# EAGLE board Orb Mainboard Rev C - SMT Antenna (EAGLE 9.7.0)
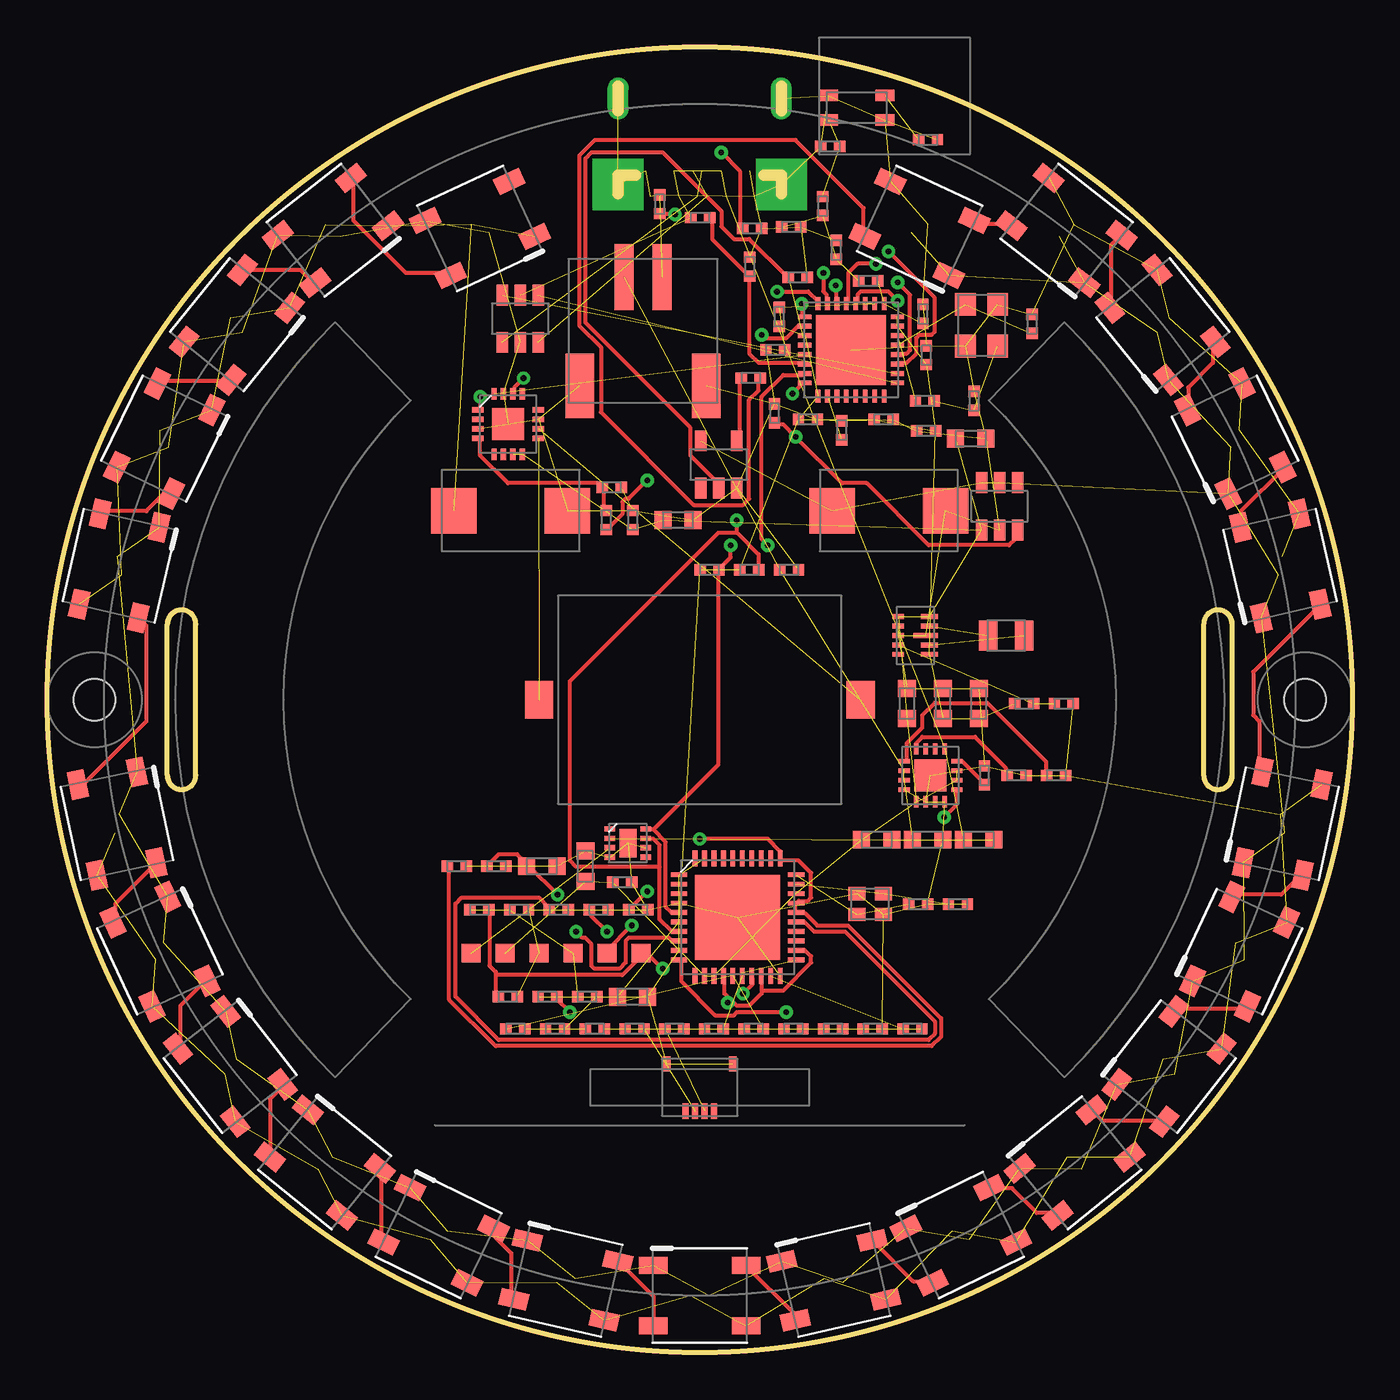
[diagram p0: board, top side]
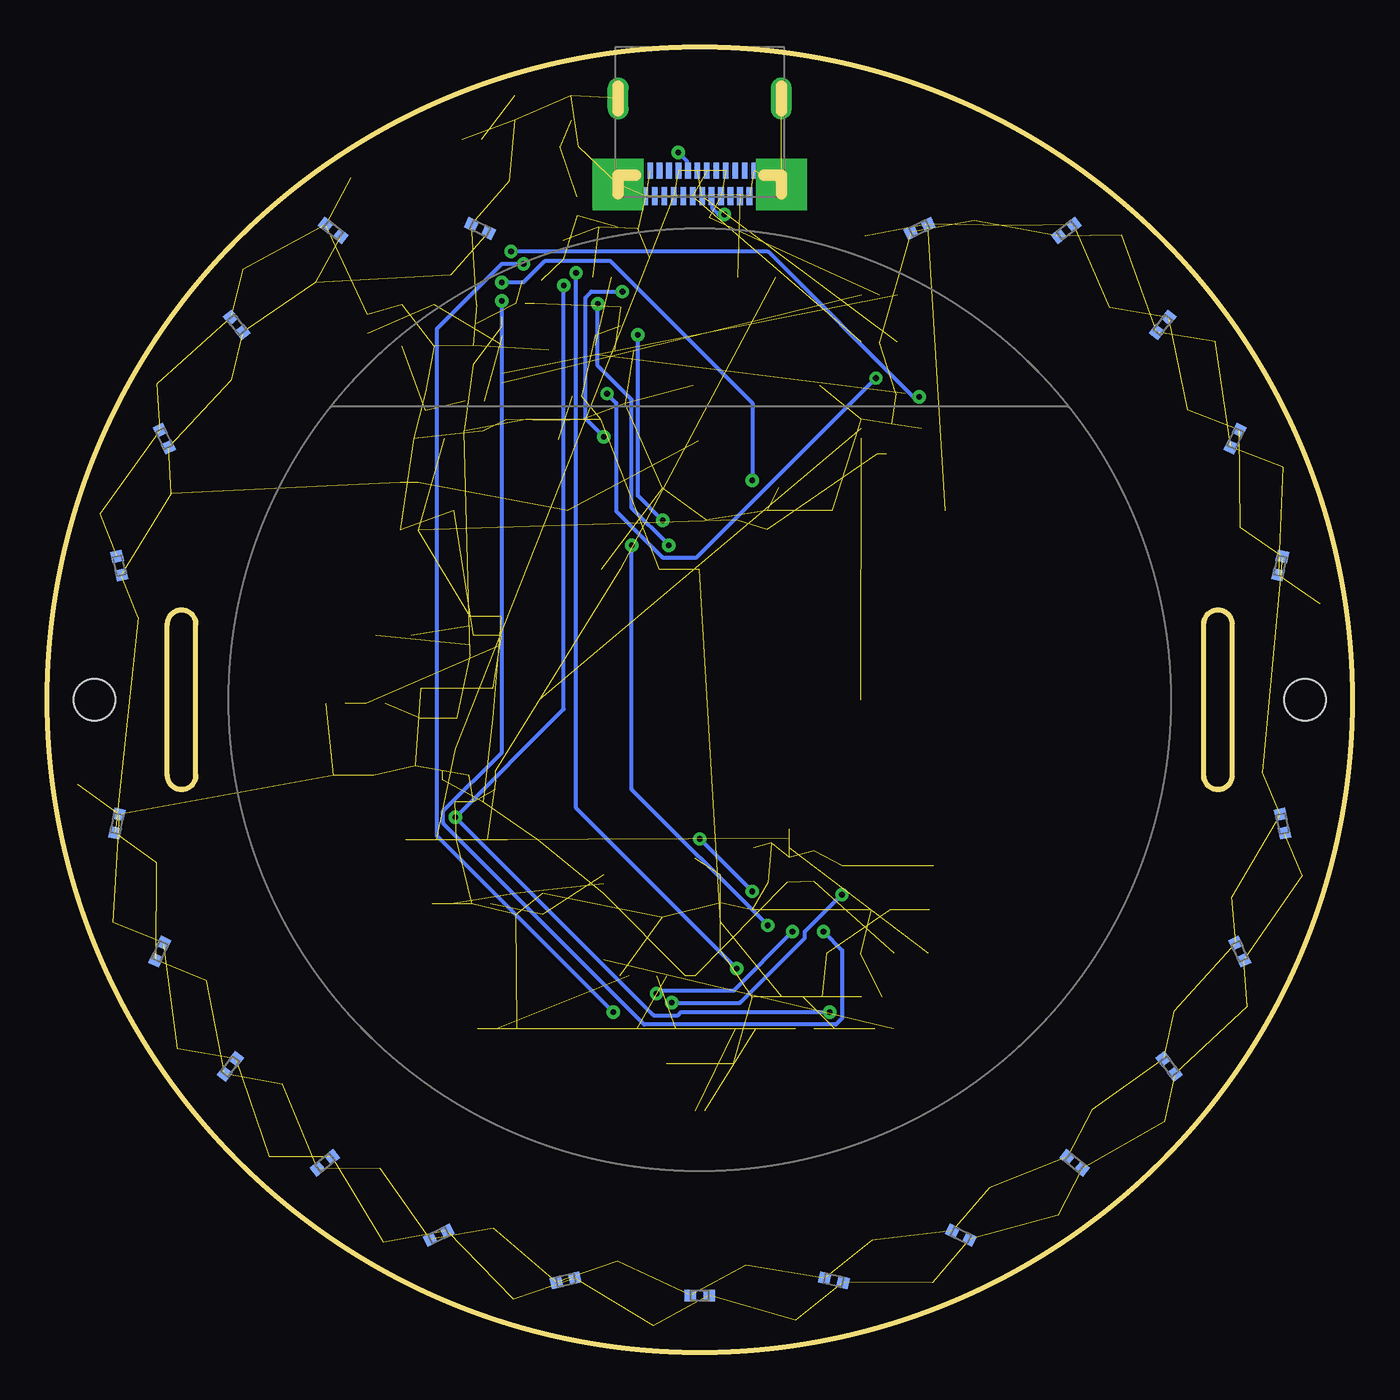
[diagram p1: board, bottom side, seen from below]

Size 69 x 69 mm. Coordinates in mm from the lower left corner, seen from the top.
Outline: 7.85,30.5 7.85,38.5 arc180 6.35,38.5 6.35,30.5 arc180 7.85,30.5
Outline: 62.65,30.5 62.65,38.5 arc180 61.15,38.5 61.15,30.5 arc180 62.65,30.5
Outline: circle at 34.5,34.5 radius 34.5
Copper layers (1*16): Top / Bottom
Stack-up Default Layer Stack: Top User Defined 0.035mm / Dielectric-1 User Defined 1.5mm / Bottom User Defined 0.035mm
Design rules: minimum drill size class=0 0.3mm, minimum drill size 0.3mm, minimum copper width class=0 0.2mm, minimum copper width 0.15mm, keepout clearance 0mil, drill distance 6mil, via restrict clearance 0mil, dimension clearance 0.25mm, restrict clearance 0mil, copper clearance wire_polygon to wire_polygon 5mil, copper clearance wire_polygon to pad_smd 5mil, copper clearance wire_polygon to via 5mil, copper clearance pad_smd to pad_smd 5mil, copper clearance pad_smd to via 5mil, copper clearance via to via 5mil, copper clearance smd to pad (same net) 5mil, copper clearance smd to via (same net) 5mil, copper clearance smd to smd (same net) 5mil
Net classes: 0 default: width 0.2 mm, drill 0.3 mm
Holes 2.2 mm at 2.5,34.5 66.5,34.5
RestrictCopper: area -0.1,32 to 5.1,37; area 63.9,32 to 69.1,37; area 49.7,14.5 to 62.3,54.5; area 6.7,14.5 to 19.3,54.5
vRestrict: area 49.7,14.5 to 62.3,54.5; area 6.7,14.5 to 19.3,54.5

## Footprints (pad centres in the part's own frame; a part is rotated, then mirrored left to right if it is on the bottom)
JOHANSON_2450AT18D = smd 1 x 0.6: 1 -1.5,-0.65; 2 1.5,-0.65; 3 1.5,0.65; 4 -1.5,0.65
C0603 = smd 0.9 x 0.95: 1 -0.8,0; 2 0.8,0
C0402 = smd 0.6 x 0.6: 1 -0.5,0; 2 0.5,0
CPOL7343 = smd 2.4 x 2.4: 1 -3,0; 2 3,0
SOT23_6 = smd 0.6 x 1.1: 1 -0.95,-1.25; 2 0,-1.25; 3 0.95,-1.25; 4 0.95,1.25; 5 0,1.25; 6 -0.95,1.25
USBC24_TE2345986 = smd 0.3 x 0.95: A1 2.625,-7.875; A2 2.125,-7.875; A3 1.625,-7.875; A4 1.125,-7.875; A5 0.625,-7.875; A6 0.125,-7.875; A7 -0.375,-7.875; A8 -0.875,-7.875; A9 -1.375,-7.875; A10 -1.875,-7.875; A11 -2.375,-7.875; A12 -2.875,-7.875 | smd 0.3 x 0.85: B1 -2.625,-6.525; B2 -2.125,-6.525; B3 -1.625,-6.525; B4 -1.125,-6.525; B5 -0.625,-6.525; B6 -0.125,-6.525; B7 0.375,-6.525; B8 0.875,-6.525; B9 1.375,-6.525; B10 1.875,-6.525; B11 2.375,-6.525; B12 2.875,-6.525 | drill 0.6 pad 2.7 square: S1 -4.32,-7.25; S2 4.32,-7.25 | drill 0.6 pad 1.075 long: S3 -4.32,-2.7; S4 4.32,-2.7
JST_S2B_PH_SM4_TB = smd 1 x 3.5: 1 -1,2.85; 2 1,2.85 | smd 1.5 x 3.4: S1 -3.35,-2.9; S2 3.35,-2.9
FPC4_PLACEHOLDER = smd 0.3 x 0.8: 1 0.75,-1.25; 2 0.25,-1.25; 3 -0.25,-1.25; 4 -0.75,-1.25 | smd 0.4 x 0.8: M1 -1.75,1.25; M2 1.75,1.25
L2016 = smd 1 x 1.6: 1 -0.95,0; 2 0.95,0
L0402 = smd 0.6 x 0.6: 1 -0.5,0; 2 0.5,0
WS2812B_5050 = smd 1.5 x 0.9: 1 -2.45,1.6; 2 -2.45,-1.6; 3 2.45,-1.6; 4 2.45,1.6
R0402 = smd 0.6 x 0.6: 1 -0.5,0; 2 0.5,0
SPK_PADS = smd 1.5 x 2: 1 -8.5,0; 2 8.5,0
TP1MM = smd 1 x 1: 1 0,0
ESP32C3_QFN32 = smd 0.7 x 0.25: 1 -2.45,1.75; 2 -2.45,1.25; 3 -2.45,0.75; 4 -2.45,0.25; 5 -2.45,-0.25; 6 -2.45,-0.75; 7 -2.45,-1.25; 8 -2.45,-1.75; 17 2.45,-1.75; 18 2.45,-1.25; 19 2.45,-0.75; 20 2.45,-0.25; 21 2.45,0.25; 22 2.45,0.75; 23 2.45,1.25; 24 2.45,1.75 | smd 0.25 x 0.7: 9 -1.75,-2.45; 10 -1.25,-2.45; 11 -0.75,-2.45; 12 -0.25,-2.45; 13 0.25,-2.45; 14 0.75,-2.45; 15 1.25,-2.45; 16 1.75,-2.45; 25 1.75,2.45; 26 1.25,2.45; 27 0.75,2.45; 28 0.25,2.45; 29 -0.25,2.45; 30 -0.75,2.45; 31 -1.25,2.45; 32 -1.75,2.45 | smd 3.7 x 3.7: 33 0,0
HVQFN40_6X6 = smd 0.85 x 0.25: 1 -3.1,2.25; 2 -3.1,1.75; 3 -3.1,1.25; 4 -3.1,0.75; 5 -3.1,0.25; 6 -3.1,-0.25; 7 -3.1,-0.75; 8 -3.1,-1.25; 9 -3.1,-1.75; 10 -3.1,-2.25; 21 3.1,-2.25; 22 3.1,-1.75; 23 3.1,-1.25; 24 3.1,-0.75; 25 3.1,-0.25; 26 3.1,0.25; 27 3.1,0.75; 28 3.1,1.25; 29 3.1,1.75; 30 3.1,2.25 | smd 0.25 x 0.85: 11 -2.25,-3.1; 12 -1.75,-3.1; 13 -1.25,-3.1; 14 -0.75,-3.1; 15 -0.25,-3.1; 16 0.25,-3.1; 17 0.75,-3.1; 18 1.25,-3.1; 19 1.75,-3.1; 20 2.25,-3.1; 31 2.25,3.1; 32 1.75,3.1; 33 1.25,3.1; 34 0.75,3.1; 35 0.25,3.1; 36 -0.25,3.1; 37 -0.75,3.1; 38 -1.25,3.1; 39 -1.75,3.1; 40 -2.25,3.1 | smd 4.5 x 4.5: 41 0,0
TDFN8_2X2 = smd 0.55 x 0.28: 1 -0.95,0.75; 2 -0.95,0.25; 3 -0.95,-0.25; 4 -0.95,-0.75; 5 0.95,-0.75; 6 0.95,-0.25; 7 0.95,0.25; 8 0.95,0.75 | smd 0.9 x 1.5: 9 0,0
VQFN16_3X3 = smd 0.6 x 0.24: 1 -1.4,0.75; 2 -1.4,0.25; 3 -1.4,-0.25; 4 -1.4,-0.75; 9 1.4,-0.75; 10 1.4,-0.25; 11 1.4,0.25; 12 1.4,0.75 | smd 0.24 x 0.6: 5 -0.75,-1.4; 6 -0.25,-1.4; 7 0.25,-1.4; 8 0.75,-1.4; 13 0.75,1.4; 14 0.25,1.4; 15 -0.25,1.4; 16 -0.75,1.4 | smd 1.68 x 1.68: 17 0,0
VSON10_2X3 = smd 0.6 x 0.25: 1 -0.9,1; 2 -0.9,0.5; 3 -0.9,0; 4 -0.9,-0.5; 5 -0.9,-1 | smd 0.9 x 0.25: 6 0.75,-1; 7 0.75,-0.5; 9 0.75,0.5; 10 0.75,1 | smd 1.3 x 0.25: 8 0.55,0
TQFN16_3X3 = smd 0.6 x 0.28: 1 -1.6,0.75; 2 -1.6,0.25; 3 -1.6,-0.25; 4 -1.6,-0.75; 9 1.6,-0.75; 10 1.6,-0.25; 11 1.6,0.25; 12 1.6,0.75 | smd 0.28 x 0.6: 5 -0.75,-1.6; 6 -0.25,-1.6; 7 0.25,-1.6; 8 0.75,-1.6; 13 0.75,1.6; 14 0.25,1.6; 15 -0.25,1.6; 16 -0.75,1.6 | smd 1.7 x 1.7: 17 0,0
SOT23_5 = smd 0.6 x 1.1: 1 -0.95,-1.25; 2 0,-1.25; 3 0.95,-1.25; 4 0.95,1.25; 5 -0.95,1.25
XTAL2016 = smd 0.9 x 0.7: 1 -0.7,-0.55; 2 0.7,-0.55; 3 0.7,0.55; 4 -0.7,0.55
ABM8_3225 = smd 1.2 x 1.1: 1 -1.1,-0.85; 2 1.1,-0.85; 3 1.1,0.85; 4 -1.1,0.85

## Placement (x,y rotation side)
ANT1  2450AT18D0100001E  [JOHANSON_2450AT18D]  42.8,65.8 0 top
C1  10uF  [C0603]  30.95,18.8 0 top
C2  100nF  [C0402]  28.55,18.8 0 top
C3  1uF  [C0402]  24.35,18.8 0 top
C4  4.7uF  [C0603]  49.25,27.1 0 top
C5  10uF  [C0603]  43.85,27.1 0 top
C6  10uF  [C0603]  46.55,27.1 0 top
C7  100nF  [C0402]  39.22,41.38 0 top
C8  10uF  [C0603]  45.45,34.3 90 top
C9  10uF  [C0603]  47.35,34.3 90 top
C10  10uF  [C0603]  49.25,34.3 90 top
C11  100nF  [C0402]  30.4,24.85 0 top
C12  4.7uF  [C0603]  28.45,25.7 90 top
C13  4.7uF  [C0603]  26.15,25.7 0 top
C14  100nF  [C0402]  23.75,25.7 0 top
C15  1uF  [C0402]  21.65,25.7 0 top
C16  100nF  [C0402]  31.25,23.4 0 top
C17  100nF  [C0402]  29.15,23.4 0 top
C18  100nF  [C0402]  27.05,23.4 0 top
C19  100nF  [C0402]  24.95,23.4 0 top
C20  12pF  [C0402]  46.05,23.7 0 top
C21  12pF  [C0402]  48.15,23.7 0 top
C22  TBD  [C0402]  26.85,17.1 0 top
C23  TBD  [C0402]  43.65,17.1 0 top
C24  TBD  [C0402]  28.95,17.1 0 top
C25  TBD  [C0402]  41.55,17.1 0 top
C26  TBD  [C0402]  31.05,17.1 0 top
C27  TBD  [C0402]  33.15,17.1 0 top
C28  TBD  [C0402]  39.45,17.1 0 top
C29  10uF  [C0603]  33.35,44 0 top
C30  100nF  [C0402]  30.95,44 90 top
C31  10uF  [C0603]  48.82,48.3 0 top
C32  100uF  [CPOL7343]  24.5,44.5 0 top
C33  100uF  [CPOL7343]  44.5,44.5 0 top
C34  1uF  [C0402]  38.5,53 180 top
C35  100nF  [C0402]  40.22,49.32 0 top
C36  100nF  [C0402]  44.22,49.32 0 top
C37  1uF  [C0402]  42,48.75 90 top
C38  1uF  [C0402]  46.48,52.72 90 top
C39  10nF  [C0402]  46.47,48.71 180 top
C40  16pF  [C0402]  49,50.3 90 top
C41  16pF  [C0402]  52.07,54.37 90 top
C42  1pF  [C0402]  46.3,54.9 90 top
C43  1pF  [C0402]  41.72,58.28 90 top
C44  1pF  [C0402]  39.34,59.5 0 top
C45  1pF  [C0402]  41.4,63.75 180 top
C101  100nF  [C0402]  46.12,59.42 155 bottom
C102  100nF  [C0402]  53.89,59.32 142 bottom
C103  100nF  [C0402]  58.98,54.32 129 bottom
C104  100nF  [C0402]  62.81,48.31 116 bottom
C105  100nF  [C0402]  65.19,41.59 103 bottom
C106  100nF  [C0402]  65.31,27.95 78 bottom
C107  100nF  [C0402]  63.05,21.19 65 bottom
C108  100nF  [C0402]  59.32,15.11 52 bottom
C109  100nF  [C0402]  54.32,10.02 39 bottom
C110  100nF  [C0402]  48.31,6.19 26 bottom
C111  100nF  [C0402]  41.59,3.81 13 bottom
C112  100nF  [C0402]  34.5,3 0 bottom
C113  100nF  [C0402]  27.41,3.81 347 bottom
C114  100nF  [C0402]  20.69,6.19 334 bottom
C115  100nF  [C0402]  14.68,10.02 321 bottom
C116  100nF  [C0402]  9.68,15.11 308 bottom
C117  100nF  [C0402]  5.95,21.19 295 bottom
C118  100nF  [C0402]  3.69,27.95 282 bottom
C119  100nF  [C0402]  3.81,41.59 257 bottom
C120  100nF  [C0402]  6.19,48.31 244 bottom
C121  100nF  [C0402]  10.02,54.32 231 bottom
C122  100nF  [C0402]  15.11,59.32 218 bottom
C123  100nF  [C0402]  22.88,59.42 205 bottom
D1  USBLC6-2SC6  [SOT23_6]  25.01,54.65 0 top
J1  USB-C  [USBC24_TE2345986]  34.5,69 0 bottom
J2  BAT  [JST_S2B_PH_SM4_TB]  31.5,54 0 top
J3  NFC antenna  [FPC4_PLACEHOLDER]  34.5,14 0 top
L1  0.47uH  [L2016]  50.7,37.9 0 top
L2  TBD  [L0402]  24.75,17.1 0 top
L3  TBD  [L0402]  45.75,17.1 0 top
L4  2nH  [L0402]  38.7,54.75 90 top
L5  24nH  [L0402]  46.4,50.3 0 top
L6  2.4nH  [L0402]  43.4,56.65 180 top
LED1  WS2812B  [WS2812B_5050]  46.12,59.42 155 top
LED2  WS2812B  [WS2812B_5050]  53.89,59.32 142 top
LED3  WS2812B  [WS2812B_5050]  58.98,54.32 129 top
LED4  WS2812B  [WS2812B_5050]  62.81,48.31 116 top
LED5  WS2812B  [WS2812B_5050]  65.19,41.59 103 top
LED6  WS2812B  [WS2812B_5050]  65.31,27.95 78 top
LED7  WS2812B  [WS2812B_5050]  63.05,21.19 65 top
LED8  WS2812B  [WS2812B_5050]  59.32,15.11 52 top
LED9  WS2812B  [WS2812B_5050]  54.32,10.02 39 top
LED10  WS2812B  [WS2812B_5050]  48.31,6.19 26 top
LED11  WS2812B  [WS2812B_5050]  41.59,3.81 13 top
LED12  WS2812B  [WS2812B_5050]  34.5,3 0 top
LED13  WS2812B  [WS2812B_5050]  27.41,3.81 347 top
LED14  WS2812B  [WS2812B_5050]  20.69,6.19 334 top
LED15  WS2812B  [WS2812B_5050]  14.68,10.02 321 top
LED16  WS2812B  [WS2812B_5050]  9.68,15.11 308 top
LED17  WS2812B  [WS2812B_5050]  5.95,21.19 295 top
LED18  WS2812B  [WS2812B_5050]  3.69,27.95 282 top
LED19  WS2812B  [WS2812B_5050]  3.81,41.59 257 top
LED20  WS2812B  [WS2812B_5050]  6.19,48.31 244 top
LED21  WS2812B  [WS2812B_5050]  10.02,54.32 231 top
LED22  WS2812B  [WS2812B_5050]  15.11,59.32 218 top
LED23  WS2812B  [WS2812B_5050]  22.88,59.42 205 top
R1  10k  [R0402]  22.85,23.4 0 top
R3  100k  [R0402]  26.45,18.8 0 top
R4  5.1k  [R0402]  32.38,60.7 90 top
R5  5.1k  [R0402]  37.27,59.42 0 top
R6  120k  [R0402]  34.52,59.99 0 top
R7  220k  [R0402]  37.15,57.4 90 top
R8  1.8k  [R0402]  49.55,30.5 90 top
R9  1.13k  [R0402]  51.25,30.5 0 top
R10  10k  [R0402]  53.35,30.5 0 top
R11  560k  [R0402]  51.65,34.3 0 top
R12  100k  [R0402]  53.75,34.3 0 top
R13  2.2k  [R0402]  35.02,41.38 0 top
R14  2.2k  [R0402]  37.12,41.38 0 top
R15  TBD  [R0402]  35.25,17.1 0 top
R16  TBD  [R0402]  37.35,17.1 0 top
R17  2k  [R0402]  29.55,44 90 top
R18  100k  [R0402]  29.85,45.73 0 top
R19  100k  [R0402]  38.45,49.65 90 top
R20  100k  [R0402]  39.68,56.84 0 top
R21  33  [R0402]  37.2,51.51 0 top
R22  0  [R0402]  41,60.6 90 top
R23  0  [R0402]  46.57,64.11 0 top
SPK1  CMS-151103-088SP  [SPK_PADS]  34.5,34.5 0 top
TP1  EN  [TP1MM]  31.4,21.1 0 top
TP2  BOOT  [TP1MM]  29.6,21.1 0 top
TP3  3V3  [TP1MM]  27.8,21.1 0 top
TP4  GND  [TP1MM]  26,21.1 0 top
TP5  VSYS  [TP1MM]  24.2,21.1 0 top
TP6  VBAT  [TP1MM]  22.4,21.1 0 top
U1  ESP32-C3FH4X  [ESP32C3_QFN32]  42.5,53 270 top
U2  PN7161A1HN/C101E  [HVQFN40_6X6]  36.5,23 0 top
U3  MAX17048G+T10  [TDFN8_2X2]  30.7,26.92 0 top
U4  BQ24074RGTR  [VQFN16_3X3]  46.7,30.5 0 top
U5  TPS63802DLAR  [VSON10_2X3]  45.9,37.9 0 top
U6  MAX98357AETE+T  [TQFN16_3X3]  24.37,49.08 0 top
U7  TPS22918DBVR  [SOT23_6]  50.35,44.73 0 top
U8  SN74LV1T34DBVR  [SOT23_5]  35.51,46.94 0 top
Y1  27.12MHz  [XTAL2016]  43.5,23.7 0 top
Y2  40MHz  [ABM8_3225]  49.4,54.3 90 top

## Library data of the parts
ANT1 C1-C45 C101-C123 D1 J1-J3 L1-L6 LED1-LED23 R1 R3-R23 SPK1 TP1-TP6 U1-U8 Y1 Y2 = orb

## Nets
3V3: C1.1 C2.1 C9.1 C10.1 C19.1 C35.1 C36.1 C38.1 C39.1 L4.1 R1.1 R3.1 R11.1 R13.1 R14.1 TP3.1 U1.11 U1.17 U1.31 U1.32 U2.6 U5.6
AMP_SD: R17.1 U1.28
AMP_SD_R: R17.2 R18.1 U6.4
ANT_FEED: ANT1.1 C45.1 R22.2
ANT_GND_TUNE: ANT1.3 R23.1
BOOT: TP2.1 U1.15
CC1: J1.A5 R4.1
CC2: J1.B5 R5.1
CHG_STATUS: R3.2 U1.6 U4.9
EN: C3.1 R1.2 TP1.1 U1.7
ESP_RF_CHIP: C42.1 L6.1 U1.1
ESP_VDD_RF: C34.1 L4.2 U1.2 U1.3
ESP_VDD_SPI: C37.1 U1.18
ESP_XTAL_DRIVE: C40.1 L5.2 Y2.1
ESP_XTAL_N: C41.1 U1.29 Y2.3
ESP_XTAL_P: L5.1 U1.30
FB_3V3: R11.2 R12.1 U5.4
GND: ANT1.2 ANT1.4 C1.2 C2.2 C3.2 C4.2 C5.2 C6.2 C7.2 C8.2 C9.2 C10.2 C11.2 C12.2 C13.2 C14.2 C15.2 C16.2 C17.2 C18.2 C19.2 C20.2 C21.2 C22.2 C23.2 C29.2 C30.2 C31.2 C32.2 C33.2 C34.2 C35.2 C36.2 C37.2 C38.2 C39.2 C40.2 C41.2 C42.2 C43.2 C44.2 C45.2 C101.2 C102.2 C103.2 C104.2 C105.2 C106.2 C107.2 C108.2 C109.2 C110.2 C111.2 C112.2 C113.2 C114.2 C115.2 C116.2 C117.2 C118.2 C119.2 C120.2 C121.2 C122.2 C123.2 D1.2 J1.A1 J1.A12 J1.B1 J1.B12 J1.S1 J1.S2 J1.S3 J1.S4 J2.2 J2.S1 J2.S2 J3.M1 J3.M2 LED1.3 LED2.3 LED3.3 LED4.3 LED5.3 LED6.3 LED7.3 LED8.3 LED9.3 LED10.3 LED11.3 LED12.3 LED13.3 LED14.3 LED15.3 LED16.3 LED17.3 LED18.3 LED19.3 LED20.3 LED21.3 LED22.3 LED23.3 R4.2 R5.2 R7.2 R8.2 R9.2 R10.2 R12.2 R18.2 R19.2 R20.2 R23.2 TP4.1 U1.33 U2.1 U2.2 U2.3 U2.4 U2.9 U2.20 U2.39 U2.41 U3.1 U3.4 U3.6 U3.9 U4.4 U4.6 U4.8 U4.17 U5.2 U5.3 U5.8 U6.3 U6.11 U6.15 U6.17 U7.2 U8.3 Y1.2 Y1.4 Y2.2 Y2.4
I2C_SCL: R14.2 U1.10 U2.7 U3.7
I2C_SDA: R13.2 U1.9 U2.5 U3.8
I2S_BCLK: U1.13 U6.16
I2S_DIN: U1.27 U6.1
I2S_LRCLK: U1.16 U6.14
ILIM: R8.1 U4.12
ISET: R9.1 U4.16
LED_CHAIN_1: LED1.2 LED2.4
LED_CHAIN_2: LED2.2 LED3.4
LED_CHAIN_3: LED3.2 LED4.4
LED_CHAIN_4: LED4.2 LED5.4
LED_CHAIN_5: LED5.2 LED6.4
LED_CHAIN_6: LED6.2 LED7.4
LED_CHAIN_7: LED7.2 LED8.4
LED_CHAIN_8: LED8.2 LED9.4
LED_CHAIN_9: LED9.2 LED10.4
LED_CHAIN_10: LED10.2 LED11.4
LED_CHAIN_11: LED11.2 LED12.4
LED_CHAIN_12: LED12.2 LED13.4
LED_CHAIN_13: LED13.2 LED14.4
LED_CHAIN_14: LED14.2 LED15.4
LED_CHAIN_15: LED15.2 LED16.4
LED_CHAIN_16: LED16.2 LED17.4
LED_CHAIN_17: LED17.2 LED18.4
LED_CHAIN_18: LED18.2 LED19.4
LED_CHAIN_19: LED19.2 LED20.4
LED_CHAIN_20: LED20.2 LED21.4
LED_CHAIN_21: LED21.2 LED22.4
LED_CHAIN_22: LED22.2 LED23.4
LED_DATA_0: LED1.4 R21.2
LED_DATA_3V3: R20.1 U1.12 U8.2
LED_DATA_BUF: R21.1 U8.4
LED_EN: R19.1 U1.8 U7.3
NFC_ANT_N: C25.2 C26.2 C28.1 J3.3
NFC_ANT_P: C24.2 C26.1 C27.1 J3.2
NFC_EMC1: C22.1 C24.1 L2.2
NFC_EMC2: C23.1 C25.1 L3.2
NFC_IRQ: U1.4 U2.8
NFC_RXC1: C27.2 R15.1
NFC_RXC2: C28.2 R16.1
NFC_RXN: R16.2 U2.15
NFC_RXP: R15.2 U2.16
NFC_TX1: L2.1 U2.21
NFC_TX2: L3.1 U2.19
NFC_VDD: C15.1 C16.1 U2.26 U2.27 U2.31
NFC_VDDHF: C18.1 U2.25
NFC_VEN: U1.5 U2.10
NFC_VMID: C17.1 U2.17
NFC_XTAL1: C20.1 U2.30 Y1.1
NFC_XTAL2: C21.1 U2.29 Y1.3
RF_50OHM: C43.1 C44.1 L6.2 R22.1
SPK_N: SPK1.2 U6.10
SPK_P: SPK1.1 U6.9
SW1: L1.1 U5.9
SW2: L1.2 U5.7
TS: R10.1 U4.1
USB_DN: D1.4 U1.25
USB_DN_J: D1.3 J1.A7 J1.B7
USB_DP: D1.6 U1.26
USB_DP_J: D1.1 J1.A6 J1.B6
VBAT: C6.1 C7.1 J2.1 TP6.1 U3.2 U3.3 U4.2 U4.3
VBUS: C4.1 D1.5 J1.A4 J1.A9 J1.B4 J1.B9 R6.1 U4.13
VBUS_SENSE: R6.2 R7.1 U1.14
VDD_TX: C13.1 C14.1 U2.14 U2.18 U2.22
VLED: C32.1 C33.1 C101.1 C102.1 C103.1 C104.1 C105.1 C106.1 C107.1 C108.1 C109.1 C110.1 C111.1 C112.1 C113.1 C114.1 C115.1 C116.1 C117.1 C118.1 C119.1 C120.1 C121.1 C122.1 C123.1 LED1.1 LED2.1 LED3.1 LED4.1 LED5.1 LED6.1 LED7.1 LED8.1 LED9.1 LED10.1 LED11.1 LED12.1 LED13.1 LED14.1 LED15.1 LED16.1 LED17.1 LED18.1 LED19.1 LED20.1 LED21.1 LED22.1 LED23.1 U7.5 U7.6 U8.5
VSYS: C5.1 C8.1 C11.1 C12.1 C29.1 C30.1 C31.1 TP5.1 U2.12 U2.13 U2.28 U4.5 U4.10 U4.11 U5.1 U5.10 U6.7 U6.8 U7.1

## Tracks (layer width: path | path; a pad name or v marks a point on that pad's centre or on a via)
3V3  (21 unrouted)
AMP_SD  (via drill 0.3)
  Top 0.2: v31.72,46.11 30.74,45.13 30.58,45.13 30.41,44.96 30.41,44.31 29.76,43.66 29.59,43.66 R17.1 | v44.96,56.57 45.62,55.92 45.62,52.98 45.45,52.81 44.96,52.81 U1.28
  Bottom 0.2: v31.72,46.11 31.72,50.2 39.24,57.72 42.67,57.72 43.82,56.57 v44.96,56.57
AMP_SD_R
  Top 0.2: R17.2 29.43,44.64 29.43,45.62 R18.1 29.27,45.78 29.1,45.95 24.36,45.95 22.89,47.42 22.89,48.23 U6.4
ANT_FEED  (2 unrouted)
ANT_GND_TUNE  (1 unrouted)
BOOT  (via drill 0.3)
  Top 0.2: v38.1,42.67 37.77,43 37.77,50.52 38.91,51.67 39.9,51.67 U1.15 | v30.9,22.56 29.59,21.26 TP2.1
  Bottom 0.2: v38.1,42.67 38.1,29.76 v30.9,22.56
CC1  (via drill 0.3)
  Top 0.2: v33.19,60.17 32.54,60.17 R4.1
  Bottom 0.2: v33.19,60.17 33.52,60.17 33.85,60.5 33.85,60.99 J1.A5
CC2  (via drill 0.3)
  Top 0.2: v35.65,63.44 36.63,62.46 36.63,59.52 R5.1
  Bottom 0.2: v35.65,63.44 35.15,62.95 35.15,62.62 J1.B5
CHG_STATUS  (via drill 0.3)
  Top 0.2: v27.63,17.99 26.98,18.64 R3.2 | v47.42,28.29 48.07,28.94 48.07,29.76 U4.9 | v41.69,56.41 41.69,55.59 U1.6
  Bottom 0.2: v27.63,17.99 35.48,17.99 35.65,17.82 36.95,17.82 v47.42,28.29 41.69,34.01 v41.69,56.41
EN  (via drill 0.3)
  Top 0.2: 23.71,19.95 23.71,20.11 23.38,20.44 23.38,23.38 R1.2 | 23.71,19.95 23.71,18.8 C3.1 | v41.04,57.06 41.04,56.08 41.2,55.92 41.2,55.59 U1.7 | v32.54,20.27 31.56,21.26 TP1.1 31.56,21.09 30.41,19.95 23.71,19.95
  Bottom 0.2: v41.04,57.06 41.04,28.78 v32.54,20.27
ESP_RF_CHIP  (2 unrouted)
ESP_VDD_RF  (3 unrouted)
ESP_VDD_SPI  (1 unrouted)
ESP_XTAL_DRIVE  (2 unrouted)
ESP_XTAL_N  (2 unrouted)
ESP_XTAL_P  (1 unrouted)
FB_3V3  (2 unrouted)
GND  (143 unrouted)
I2C_SCL  (via drill 0.3)
  Top 0.2: 32.37,25.67 32.37,22.89 33.03,22.24 33.35,22.24 U2.7 | 32.37,25.67 32.37,26.82 32.05,27.14 31.72,27.14 U3.7 | 36.46,43.33 37.61,42.18 37.61,41.53 R14.2 | 36.46,43.33 35.48,43.33 27.63,35.48 27.63,26 27.96,25.67 32.37,25.67 | v37.77,53.79 37.93,53.63 39.08,53.63 39.73,54.28 39.9,54.28 U1.10 | 36.46,43.33 v36.46,43.98
  Bottom 0.2: v37.77,53.79 37.77,45.29 v36.46,43.98
I2C_SDA  (via drill 0.3)
  Top 0.2: 32.05,27.63 31.72,27.63 U3.8 | 32.05,27.63 32.7,26.98 32.7,23.55 33.03,23.22 33.35,23.22 U2.5 | 32.05,27.63 35.48,31.07 35.48,41.37 R13.2 35.65,41.53 36.13,42.02 v36.13,42.67 | v39.9,55.43 39.9,54.77 U1.9
  Bottom 0.2: v39.9,55.43 39.9,52.16 38.1,50.36 38.1,44.64 v36.13,42.67
I2S_BCLK  (1 unrouted)
I2S_DIN  (via drill 0.3)
  Top 0.2: v22.89,50.52 22.89,49.87 U6.1 | v44.47,58.21 46.93,55.75 46.93,53.96 46.76,53.79 46.11,53.79 45.95,53.63 45.95,52.81 45.45,52.32 44.96,52.32 U1.27
  Bottom 0.2: v22.89,50.52 23.22,50.52 30.9,58.21 v44.47,58.21
I2S_LRCLK  (via drill 0.3)
  Top 0.2: v25.18,51.5 24.69,51.01 24.69,50.69 U6.14 | v39.41,50.69 39.9,51.18 U1.16
  Bottom 0.2: v25.18,51.5 34.66,42.02 36.46,42.02 38.91,44.47 38.91,50.2 v39.41,50.69
ILIM
  Top 0.2: U4.12 48.23,31.23 48.4,31.23 49.54,30.09 R8.1
ISET
  Top 0.2: R9.1 50.69,30.58 50.69,30.9 49.05,32.54 46.27,32.54 45.95,32.21 45.95,32.05 U4.16
LED_CHAIN_1
  Top 0.2: LED2.4 50.85,59.68 49.05,59.68 LED1.2
LED_CHAIN_2
  Top 0.2: LED3.4 56.25,55.27 56.25,58.53 56.74,59.02 LED2.2
LED_CHAIN_3
  Top 0.2: LED4.4 60.33,49.87 60.33,51.01 61.64,52.32 61.64,53.3 LED3.2
LED_CHAIN_4
  Top 0.2: LED5.4 63.11,43.66 63.11,44.47 65.4,46.76 LED4.2
LED_CHAIN_5
  Top 0.2: LED6.4 64.09,30.74 64.09,33.35 63.77,33.68 63.77,35.97 67.2,39.41 LED5.2
LED_CHAIN_6
  Top 0.2: LED7.4 62.78,24.2 65.24,24.2 66.22,25.18 LED6.2
LED_CHAIN_7
  Top 0.2: LED8.4 59.68,18.15 63.44,18.15 LED7.2
LED_CHAIN_8
  Top 0.2: LED8.2 59.02,12.26 55.75,12.26 55.27,12.75 LED9.4
LED_CHAIN_9
  Top 0.2: LED10.4 49.87,8.67 51.01,8.67 52.32,7.36 53.3,7.36 LED9.2
LED_CHAIN_10
  Top 0.2: LED10.2 46.76,3.76 45.78,3.76 43.66,5.89 LED11.4
LED_CHAIN_11
  Top 0.2: LED11.2 39.41,1.8 39.41,2.13 36.95,4.58 LED12.4
LED_CHAIN_12
  Top 0.2: LED12.2 32.05,1.47 32.05,2.95 30.25,4.74 LED13.4
LED_CHAIN_13
  Top 0.2: LED13.2 24.53,2.95 24.53,5.23 23.71,6.05 23.71,6.54 LED14.4
LED_CHAIN_14
  Top 0.2: LED14.2 17.66,5.89 17.66,9.65 LED15.4
LED_CHAIN_15
  Top 0.2: LED15.2 11.77,10.46 11.77,13.41 12.43,14.06 LED16.4
LED_CHAIN_16
  Top 0.2: LED16.2 7.03,16.19 7.03,18.31 8.34,19.62 LED17.4
LED_CHAIN_17
  Top 0.2: LED17.2 3.6,22.89 3.6,23.71 5.72,25.84 LED18.4
LED_CHAIN_18
  Top 0.2: LED18.2 1.64,30.09 1.96,30.09 5.23,33.35 5.23,38.42 4.91,38.75 LED19.4
LED_CHAIN_19
  Top 0.2: LED19.2 2.95,44.47 5.23,44.47 6.05,45.29 6.54,45.29 LED20.4
LED_CHAIN_20
  Top 0.2: LED20.2 5.89,51.34 9.65,51.34 LED21.4
LED_CHAIN_21
  Top 0.2: LED21.2 10.46,57.23 13.41,57.23 14.06,56.57 LED22.4
LED_CHAIN_22
  Top 0.2: LED22.2 16.19,61.97 16.19,59.84 18.97,57.06 21.26,57.06 LED23.4
LED_DATA_0
  Top 0.2: R21.2 37.61,51.5 37.61,50.85 37.12,50.36 37.12,45.13 36.79,44.8 34.17,44.8 29.27,49.71 29.27,53.14 28.12,54.28 28.12,63.28 28.94,64.09 39.57,64.09 43.16,60.5 43.16,59.02 LED1.4
LED_DATA_3V3  (1 unrouted)
  Top 0.2: R20.1 39.08,56.9 37.12,58.86 36.3,58.86 35.65,59.52 35.65,60.33 32.54,63.44 28.78,63.44 28.45,63.11 28.45,54.45 34.01,48.89 34.01,47.42 35.65,45.78 U8.2
LED_DATA_BUF
  Top 0.2: R21.1 36.63,51.5 36.63,48.4 36.46,48.23 U8.4
LED_EN  (via drill 0.3)
  Top 0.2: R19.1 38.59,49.05 38.91,49.05 v39.57,48.4 42.02,45.95 43.33,45.95 46.6,42.67 50.85,42.67 51.18,43 51.18,43.33 U7.3 | v38.59,56.08 40.22,56.08 40.71,55.59 U1.8
  Bottom 0.2: v38.59,56.08 40.22,56.08 40.55,55.75 40.55,49.38 v39.57,48.4
NFC_ANT_N  (3 unrouted)
NFC_ANT_P  (3 unrouted)
NFC_EMC1  (2 unrouted)
NFC_EMC2  (2 unrouted)
NFC_IRQ  (via drill 0.3)
  Top 0.2: v44.96,55.59 44.47,56.08 43,56.08 42.84,55.92 42.84,55.59 U1.4 | v27.96,22.24 28.29,21.91 28.45,21.91 28.78,21.58 28.78,20.44 28.94,20.27 30.25,20.27 30.58,20.6 30.58,21.75 30.74,21.91 32.87,21.91 33.03,21.75 33.35,21.75 U2.8
  Bottom 0.2: v44.96,55.59 44.96,31.72 48.07,28.61 48.07,27.96 37.44,17.33 27.31,17.33 26.98,17.66 26.98,21.26 v27.96,22.24
NFC_RXC1  (1 unrouted)
NFC_RXC2  (1 unrouted)
NFC_RXN  (1 unrouted)
NFC_RXP  (1 unrouted)
NFC_TX1  (1 unrouted)
NFC_TX2  (1 unrouted)
NFC_VDD  (via drill 0.3)
  Top 0.2: v31.72,24.36 30.9,23.55 C16.1 | v34.5,27.14 38.1,27.14 38.75,26.49 38.75,26.16 U2.31 38.75,26 39.73,26 40.39,25.34 40.39,24.04 40.22,23.87 39.73,23.87 U2.27 39.57,23.71 39.57,23.22 U2.26 39.73,23.22 40.06,23.22 40.71,22.56 42.35,22.56 47.25,17.66 47.25,16.68 46.76,16.19 23.71,16.19 21.26,18.64 21.26,25.67 C15.1
  Bottom 0.2: v34.5,27.14 v31.72,24.36
NFC_VDDHF
  Top 0.2: C18.1 26.49,23.55 26,24.04 21.91,24.04 21.58,23.71 21.58,18.8 23.87,16.52 46.6,16.52 46.93,16.84 46.93,17.5 42.18,22.24 40.55,22.24 40.06,22.73 39.73,22.73 U2.25
NFC_VEN  (via drill 0.3)
  Top 0.2: v43.82,57.55 42.84,57.55 42.35,57.06 42.35,55.59 U1.5 | v39.08,17.99 36.46,17.99 36.3,17.82 35.32,17.82 33.52,19.62 33.52,20.77 U2.10
  Bottom 0.2: v43.82,57.55 44.96,57.55 48.4,54.12 48.4,27.31 v39.08,17.99
NFC_VMID  (via drill 0.3)
  Top 0.2: v29.59,22.24 28.78,23.05 28.78,23.38 C17.1 | v36.79,18.97 37.28,19.46 37.28,19.79 U2.17
  Bottom 0.2: v29.59,22.24 32.7,19.13 36.63,19.13 v36.79,18.97
NFC_XTAL1  (2 unrouted)
NFC_XTAL2  (2 unrouted)
RF_50OHM  (3 unrouted)
SPK_N  (1 unrouted)
SPK_P  (1 unrouted)
SW1  (1 unrouted)
SW2  (1 unrouted)
TS
  Top 0.2: R10.1 52.81,30.58 52.81,31.23 49.71,34.34 46.93,34.34 46.27,33.68 46.27,33.03 45.45,32.21 45.45,31.23 U4.1
USB_DN  (1 unrouted)
USB_DN_J  (2 unrouted)
USB_DP  (1 unrouted)
USB_DP_J  (2 unrouted)
VBAT  (7 unrouted)
VBUS  (7 unrouted)
VBUS_SENSE
  Top 0.2: R6.2 35.15,59.84 35.15,58.86 36.95,57.06 37.12,57.06 R7.1 37.12,56.9 37.12,52.81 37.61,52.32 39.9,52.32 U1.14
VDD_TX  (via drill 0.3)
  Top 0.2: C14.1 23.38,25.84 23.87,26.32 24.85,26.32 25.34,25.84 C13.1 25.51,25.67 v26.98,24.2 | 36.13,18.64 36.46,18.31 37.12,18.31 37.77,18.97 37.77,19.13 | 36.13,18.64 35.81,18.97 35.81,19.79 U2.14 | 37.77,19.13 37.77,19.79 U2.18 | 37.77,19.13 38.91,19.13 40.39,20.6 40.39,20.93 40.06,21.26 39.73,21.26 U2.22 | 36.13,18.64 v35.97,18.48
  Bottom 0.2: v26.98,24.2 28.94,22.24 28.94,21.91 32.37,18.48 v35.97,18.48
VLED  (50 unrouted)
VSYS  (18 unrouted)
(copper drawn outside any net)
  shapes: Bottom area x1, Top area x1

## Text on the board
tDocu: BRANDING AREA (keep clear) | ORB 69 mm - ENGINEERING DRAFT